# Altium PCB PG-TSDSO-14_L4.9-W3.9-P0.65-LS6.0-BL-EP.pcbdoc
Units mm, origin at the board's own origin, x right, y up, seen from the top; angles counter-clockwise.
Board outline 18.2 x 19.7 mm, 2 copper layers (Top Layer, Bottom Layer); 1 components, 0 nets, 15 pads, 0 vias.
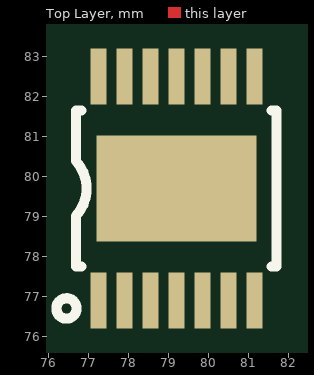
[diagram p0: Top Layer view]
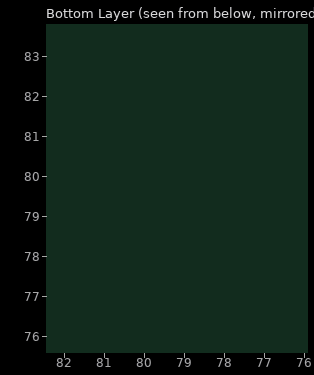
[diagram p1: Bottom Layer view, seen from below]

## Layer stack, top to bottom
Top Solder: solder mask 0.0102, Solder Resist, Dk 3.5
Top Layer: signal copper 0.0356
Dielectric 1: dielectric 0.32, FR-4, Dk 4.8
Bottom Layer: signal copper 0.0356
Bottom Solder: solder mask 0.0102, Solder Resist, Dk 3.5

## Board outline
88.054,69.85 69.85,69.85 69.85,89.548 88.054,89.548

## Components (designator, comment, footprint, x,y, rotation, side; value= is the part's Value field where it differs from the comment)
? "PG-TSDSO-14_L4.9-W3.9-P0.65-LS6.0-BL-EP" PG-TSDSO-14_L4.9-W3.9-P0.65-LS6.0-BL-EP 79.205,79.699 r0 top

## Footprints (in the part's own frame and the unit in brackets; to place one, negate y for a bottom-side part, rotate by r counter-clockwise, add the part's x,y. Pads: shape width x height; smd on the part's side, far side on the other; paste and mask are expansions set on the pad)
PG-TSDSO-14_L4.9-W3.9-P0.65-LS6.0-BL-EP [mil]
  rect 15.7x55.1 smd: 1(-76.8,-110.2) 2(-51.2,-110.2) 3(-25.6,-110.2) 4(0,-110.2) 5(25.6,-110.2) 6(51.2,-110.2) 7(76.8,-110.2) 8(76.8,110.2) 9(51.2,110.2) 10(25.6,110.2) 11(0,110.2) 12(-25.6,110.2) 13(-51.2,110.2) 14(-76.8,110.2)
  rect 157.5x104.3 smd: 15(0,0)
  silkscreen extent -118,-128 98,77

## Nets (pads, with @x,y where several pads share a name; then routed paths per layer and width w, separated by ;. In a path a pad name is that pad's centre, name@x,y a point inside that pad or via, vN(x,y) a via of type N, cw(c..) or ccw(c..) an arc to the next point about the centre after c; other vN are vias at no path point)
pads on no net: ?.1 ?.2 ?.3 ?.4 ?.5 ?.6 ?.7 ?.8 ?.9 ?.10 ?.11 ?.12 ?.13 ?.14 ?.15